# Altium PCB ArmBand-Sensor-Board_v2.0.PcbDoc
Units mil, origin at the board's own origin, x right, y up, seen from the top; angles counter-clockwise.
Board outline 1889.76 x 1023.87 mil, 2 copper layers (Top Layer, Bottom Layer), stack 34 mil thick; 46 components, 37 nets, 156 pads, 48 vias.
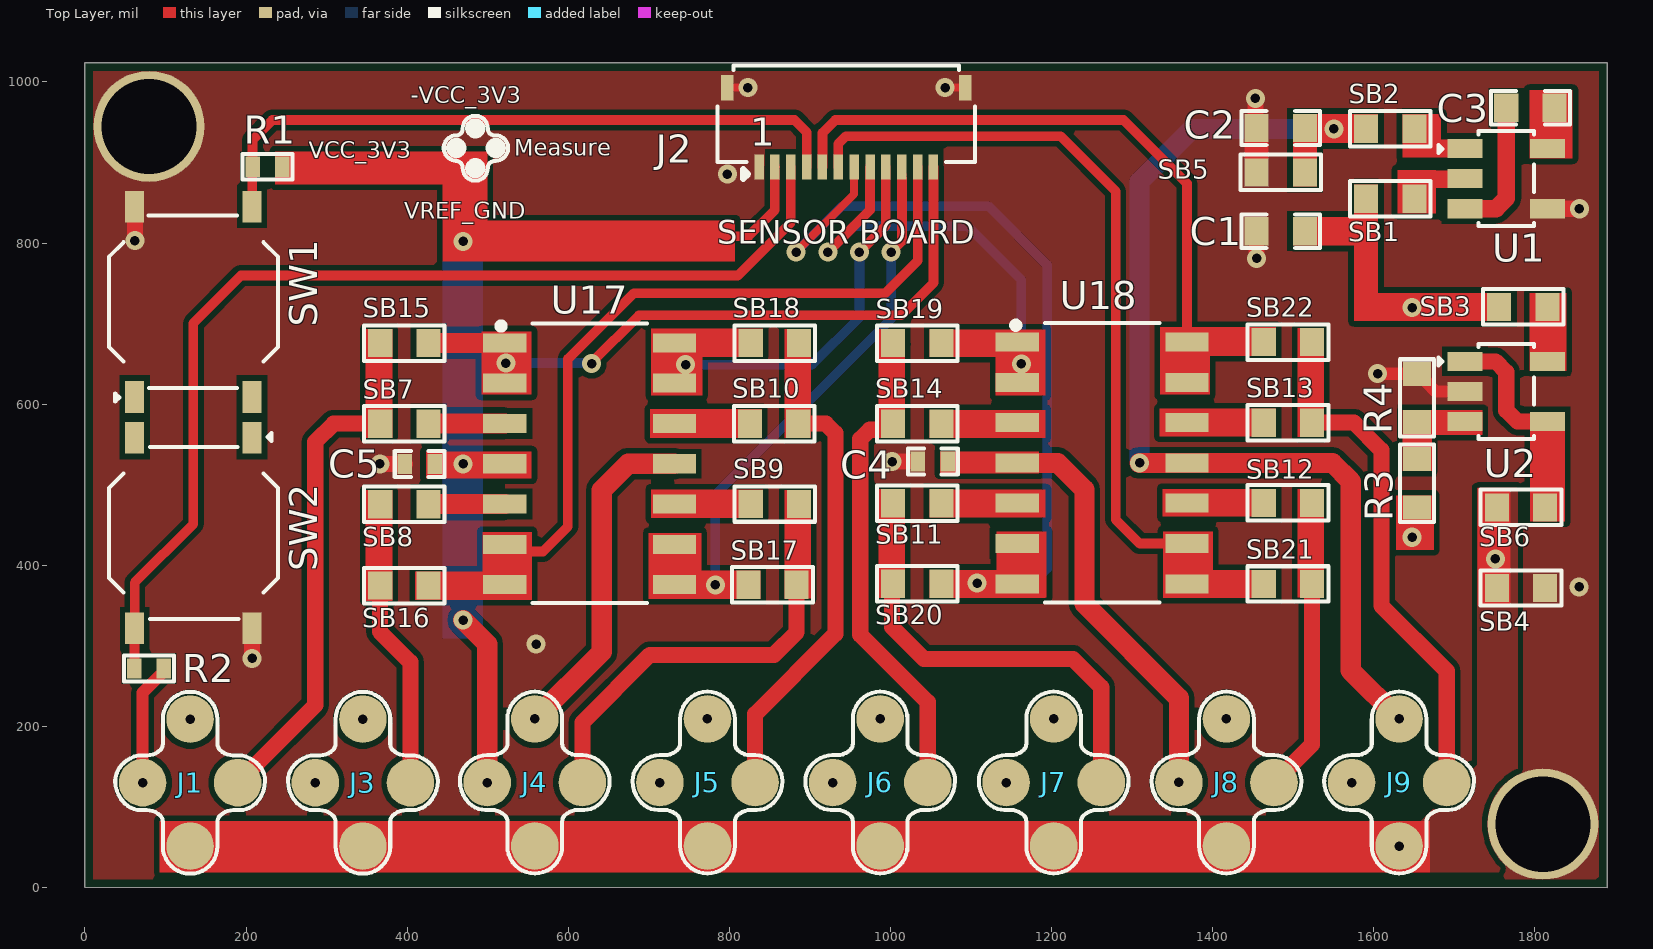
[diagram p0: Top Layer view]
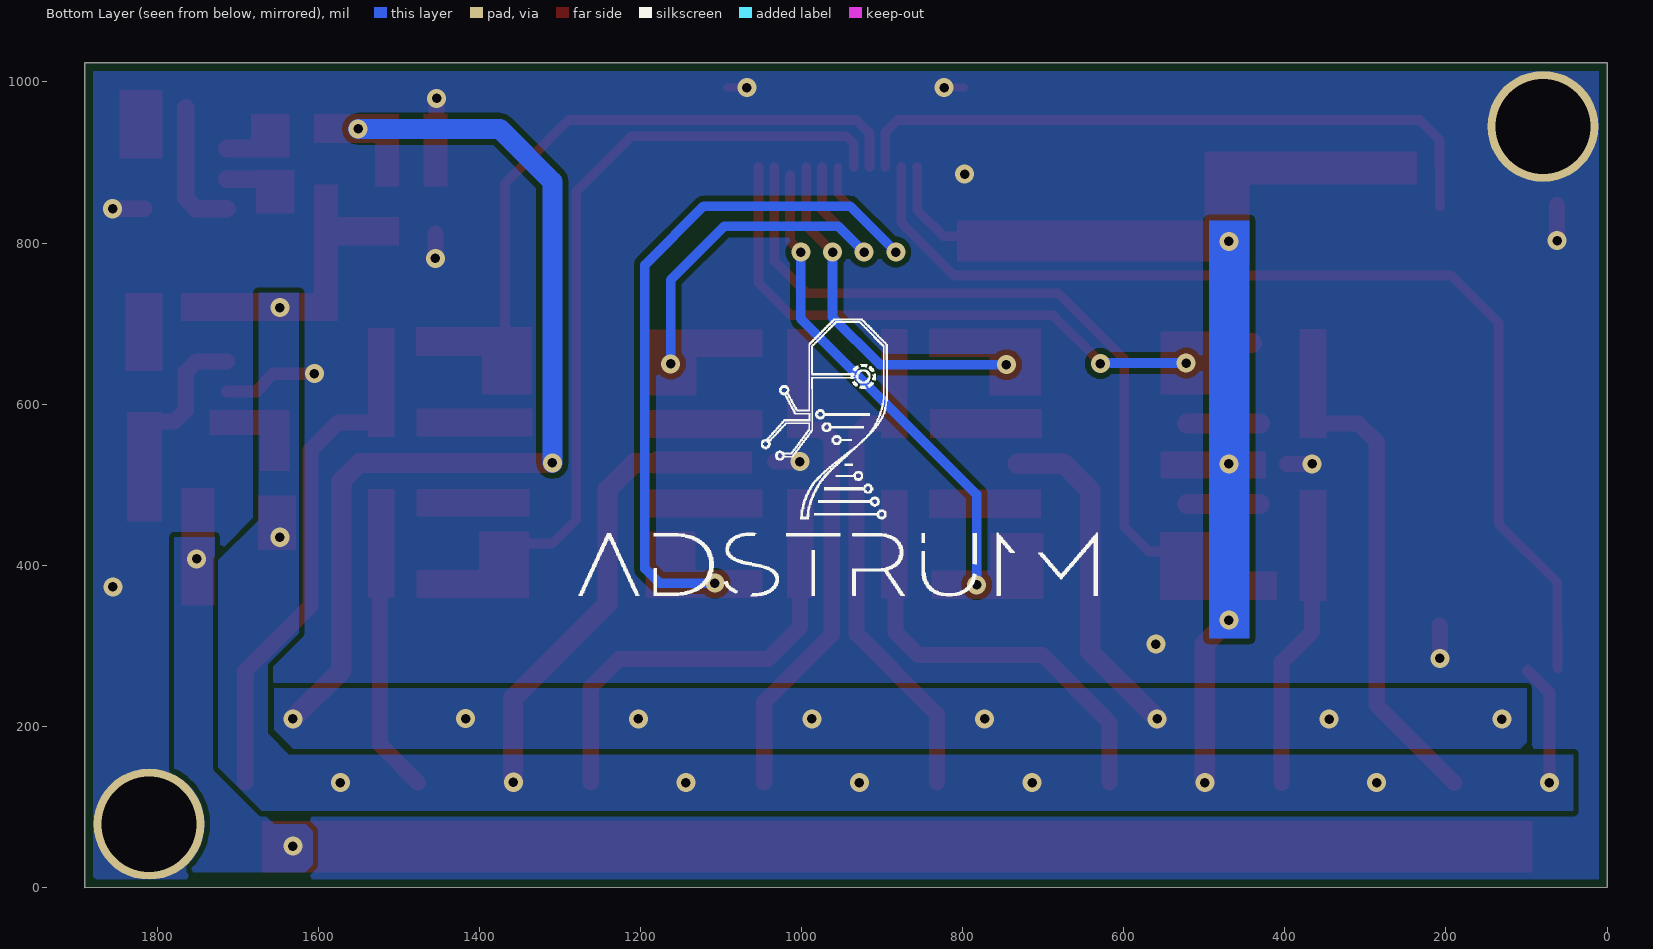
[diagram p1: Bottom Layer view, seen from below]

## Layer stack, top to bottom
Top Solder: solder mask 3, Solder Resist, Dk 3.5
Top Layer: signal copper 9
Dielectric 1: dielectric 16, FR-4, Dk 4.8
Bottom Layer: signal copper 9
Bottom Solder: solder mask 3, Solder Resist, Dk 3.5

## Board outline
0,0 0,1023.62 1889.76,1023.62 1889.76,-0.25

## Design rules (kind name [scope] priority, off if disabled: settings)
BoardOutlineClearance [All] p1: gap=0 ignorepadtopadclearanceinfootprint=FALSE except(10: Poly-OutlineEdge)
Clearance [All] p1: gap=7 ignorepadtopadclearanceinfootprint=FALSE except(0: Arc-Hole Track-Hole SMDPad-Hole THPad-Hole Via-Hole Fill-Hole Poly-Hole Region-Hole Text-Hole; 4: Arc-SMDPad Track-SMDPad SMDPad-SMDPad)
HoleSize [All] p1: absolutevalues=TRUE maxlimit=1000 minlimit=1 maxpercent=80.000 minpercent=20.000
HoleToHoleClearance [All] p1: gap=0 allowstackedmicrovias=TRUE
MinimumSolderMaskSliver [All] p1: minsoldermaskwidth=0
PolygonConnect [All] p1: connectstyle=Direct reliefconductorwidth=10 reliefentries=4 polygonreliefangle="90 Angle" airgapwidth=10
RoutingVias [All] p1: holewidth=11.81 width=23.62 viastyle="Through Hole" minholewidth=11.81 minwidth=23.62 maxholewidth=11.81 maxwidth=23.62
SilkToSilkClearance [All] p1: silktosilkclearance=0
SilkToSolderMaskClearance [IsPad] p1: minsilkscreentomaskgap=0 clearancetoexposedcopper=TRUE
SolderMaskExpansion [All] p1: expansion=4 istentingtop=FALSE
Width [All] p1: maxlimit=40 minlimit=10 preferedwidth=22
25 further rules are at their usual default settings.

## Classes and differential pairs
component class U_Opamp-Sheet2: C1 C2 C3 C4 C5 R3 R4 SB1 SB2 SB3 SB7 SB8 SB9 SB10 SB11 SB12 SB13 SB14 U1 U2 U17 U18
component class U_Connector-Sheet: J1 J2 J3 J4 J5 J6 J7 J8 J9 R1 R2 SB4 SB5 SB6 SB15 SB16 SB17 SB18 SB19 SB20 SB21 SB22 SW1 SW2

## Components (designator, comment, footprint, x,y, rotation, side; value= is the part's Value field where it differs from the comment)
C1 "10uF" Cap-0603 1484.63,814.75 r180 top
C2 "10uF" Cap-0603 1484.63,942.75 r180 top
C3 "10uF" Cap-0603 1794.63,968 r180 top locked
C4 "0.1uF" Cap-0402 1052.63,528.75 r180 top
C5 "0.1uF" Cap-0402 415.63,525.75 r180 top
J1 "2x2 Pad" "2x2 Pad" 130.63,130 r180 top locked
J2 "FH34SRJ-12S-0.5SH(50)" FH34SRJ-12S-0.5SH(50)_ 945.22,943.65 r180 top locked
J3 "2x2 Pad" "2x2 Pad" 345.06,130 r180 top locked
J4 "2x2 Pad" "2x2 Pad" 558.49,130.2 r180 top locked
J5 "2x2 Pad" "2x2 Pad" 772.92,130.2 r180 top locked
J6 "2x2 Pad" "2x2 Pad" 987.34,130.2 r180 top locked
J7 "2x2 Pad" "2x2 Pad" 1202.77,130.2 r180 top locked
J8 "2x2 Pad" "2x2 Pad" 1417.2,130.2 r180 top locked
J9 "2x2 Pad" "2x2 Pad" 1631.63,130.2 r180 top locked
R1 "10K" Res-0402 226.63,894.75 r0 top locked
R2 "10K" Res-0402 79.63,271.75 r0 top
R3 "64K" Res-0603 1653.63,501.75 r270 top locked
R4 "64K" Res-0603 1653.88,607.75 r90 top locked
SB1 "Solder Bridge" "Solder Bridge" 1620.63,855 r0 top locked
SB2 "Solder Bridge" "Solder Bridge" 1620.63,942 r180 top
SB3 "Solder Bridge" "Solder Bridge" 1785.63,720.75 r0 top
SB4 "Solder Bridge" "Solder Bridge" 1782.92,371.75 r0 top locked
SB5 "Solder Bridge" "Solder Bridge" 1484.63,887.75 r180 top
SB6 "Solder Bridge" "Solder Bridge" 1782.92,471.75 r180 top locked
SB7 "Solder Bridge 0603" "Solder Bridge" 396.63,575.75 r0 top locked
SB8 "Solder Bridge 0603" "Solder Bridge" 396.63,475.75 r0 top locked
SB9 "Solder Bridge 0603" "Solder Bridge" 856.63,476 r180 top locked
SB10 "Solder Bridge 0603" "Solder Bridge" 855.63,575.75 r180 top locked
SB11 "Solder Bridge 0603" "Solder Bridge" 1033.36,477 r0 top locked
SB12 "Solder Bridge 0603" "Solder Bridge" 1493.63,477.37 r180 top locked
SB13 "Solder Bridge 0603" "Solder Bridge" 1493.63,577 r180 top locked
SB14 "Solder Bridge 0603" "Solder Bridge" 1033.36,575.75 r0 top locked
SB15 "Solder Bridge 0603" "Solder Bridge" 396.63,675.75 r0 top locked
SB16 "Solder Bridge 0603" "Solder Bridge" 396.63,374.75 r0 top locked
SB17 "Solder Bridge 0603" "Solder Bridge" 853.63,375.75 r180 top locked
SB18 "Solder Bridge 0603" "Solder Bridge" 856.63,675.75 r180 top locked
SB19 "Solder Bridge 0603" "Solder Bridge" 1033.36,675.75 r0 top locked
SB20 "Solder Bridge 0603" "Solder Bridge" 1033.36,377 r0 top locked
SB21 "Solder Bridge 0603" "Solder Bridge" 1493.63,376.75 r180 top locked
SB22 "Solder Bridge 0603" "Solder Bridge" 1493.63,677 r180 top locked
SW1 "TC-0522C-1.7-260G" TC-0522C-1.7-260G_ 134.63,727 r90 top locked value=-
SW2 "TC-0522C-1.7-260G" TC-0522C-1.7-260G_ 134.63,440 r270 top locked value=-
U1 "SGM3207YN5G/TR" SOT-23-5 1764.63,880 r0 top locked
U2 "TPMCP6021T-E/OT" SOT-23-5 1764.63,615.75 r0 top locked
U17 "LM324DT" SO-14 626.63,526 r0 top locked
U18 "LM324DT" SO-14 1262.95,527 r0 top locked

## Footprints (in the part's own frame and the unit in brackets; to place one, negate y for a bottom-side part, rotate by r counter-clockwise, add the part's x,y. Pads: shape width x height; smd on the part's side, far side on the other; paste and mask are expansions set on the pad)
"2x2 Pad" [mm]
  round 1.5 smd paste+0 mask+0.055: 1(-1.5,0) 2(0,-2.007) 3(1.5,0) 4(0,2)
  silkscreen extent -2.36,-2.87 2.36,2.87
Cap-0402 [mil]
  rect 18x25 smd mask+2.36: 1(-18.5,0) 2(18.5,0)
  silkscreen extent -31,-16 31,16, body extent -20,-10 20,10, height 19
Cap-0603 [mil]
  rect 30x35 smd mask+2.36: 1(-30,0) 2(30,0)
  silkscreen extent -49,-21 49,21, body extent -32,-16 31,16, height 34
FH34SRJ-12S-0.5SH(50)_ [mm]
  rect 0.3x0.8 smd: 1(2.75,1.25) 2(2.25,1.25) 3(1.75,1.25) 4(1.25,1.25) 5(0.75,1.25) 6(0.25,1.25) 7(-0.25,1.25) 8(-0.75,1.25) 9(-1.25,1.25) 10(-1.75,1.25) 11(-2.25,1.25) 12(-2.75,1.25)
  rect 0.4x0.8 smd: MP1(-3.75,-1.25) MP2(3.75,-1.25)
  silkscreen extent -4.06,-1.96 4.06,1.63, body extent -4,-1.9 4,1.9, height 1
Res-0402 [mil]
  rect 18x25 smd mask+2.17: 1(-18.5,0) 2(18.5,0)
  silkscreen extent -32,-17 32,16, body extent -23,-11 23,11, height 16
Res-0603 [mil]
  rect 30x35 smd: 1(-30,0) 2(30,0)
  silkscreen extent -48,-21 48,21, body extent -31,-17 31,17, height 18
SO-14 [mm] "0.4 V/us 4 1.3MHz 3V ~ 32V, ±1.5V ~ 16V 1.5mA General Purpose SOIC-14_150mil Operational Amplifier ROHS"
  rect 1.37x0.6 smd: 1(-2.675,3.81) 2(-2.675,2.54) 3(-2.675,1.27) 4(-2.675,0) 5(-2.675,-1.27) 6(-2.675,-2.54) 7(-2.675,-3.81) 8(2.675,-3.81) 9(2.675,-2.54) 10(2.675,-1.27) 11(2.675,0) 12(2.675,1.27) 13(2.675,2.54) 14(2.675,3.81)
  silkscreen extent -2.87,-4.39 1.8,4.42, body extent -3.1,-4.37 3.1,4.37, height 1.76
"Solder Bridge" [mil] "Solder Bridge ON"
  rect 30x35 smd: 1(-30,0) 2(30,0)
  silkscreen extent -50,-22 50,22
SOT-23-5 [mm]
  rect 1.1x0.6 smd: 1(-1.3,0.95) 2(-1.3,0) 3(-1.3,-0.95) 4(1.3,-0.95) 5(1.3,0.95)
  silkscreen extent -2.13,-1.5 0.88,1.5, body extent -1.4,-1.45 1.4,1.45, height 1.45
TC-0522C-1.7-260G_ [mm]
  rect 1x0.6 smd: 1(-3,1.85) 2(3,1.85) 3(3,-1.85) 4(-3,-1.85)
  silkscreen extent -3.15,-2.67 2.72,2.67, body extent -3.2,-2.6 3.2,2.6, height 1.7

## Part data
C1 C2 C3: library part CL10A106MA8NRNC, "CAP CER 10UF 25V X5R 0603", Case Code (Imperial)=0603, Case Code (Metric)=1608, Dielectric=X5R, LCSC Part Number=C96446, Manufacturer=Samsung, Max Operating Temperature=85°C, Min Operating Temperature=-55°C, Package Quantity=1, Tolerance=20%, Voltage Rating=25V, Capacitance=10uF, Case/Package=0603, Category="Ceramic Capacitors", ComponentLink1Description=https://datasheet.ciiva.com/25766/cl10a106ma8nrnc-25766562.pdf?src-supplier=Digi-Key, ComponentLink1URL=https://datasheet.ciiva.com/25766/cl10a106ma8nrnc-25766562.pdf?src-supplier=Digi-Key, Construction=Flat, Contact Plating=Tin, Lead Free="Lead Free", Length=0.063inch, Manufacturer Part Number=CL10A106MA8NRNC, Mount="Surface Mount", Packaging="Tape and Reel", Pricing 1="4000=0.03753, 8000=0.03700, 16000=0.03595, 24000=0.03515, 32000=0.03383, 40000=0.03304, 400000=0.03225 (USD)", RoHS=Yes, RoHS Compliant=Yes, Series=CL, Supplier 1=Avnet, Supplier Part Number 1=CL10A106MA8NRNC, Termination=Wraparound, Thickness=0.035inch, Width=0.031inch
C4 C5: library part GRM155R71H104ME14D, "CAP CER 0.1UF 50V X7R 0402", Capacitance=100nF, Case/Package=0402, LCSC Part Number=C182412, Manufacturer=Murata, Max Operating Temperature=125°C, Min Operating Temperature=-55°C, Tolerance=20%, Voltage Rating=50V, Category="Ceramic Capacitors", ComponentLink1Description=http://www.mouser.com/ds/2/281/c02e-2905.pdf?src-supplier=Mouser, ComponentLink1URL=http://www.mouser.com/ds/2/281/c02e-2905.pdf?src-supplier=Mouser, ComponentLink2Description=http://search.murata.co.jp/Ceramy/image/img/A01X/G101/ENG/GRM155R71H104ME14-01.pdf?src-supplier=Digi-Key, ComponentLink2URL=http://search.murata.co.jp/Ceramy/image/img/A01X/G101/ENG/GRM155R71H104ME14-01.pdf?src-supplier=Digi-Key, ComponentLink3Description=http://psearch.en.murata.com/capacitor/product/GRM155R71H104ME14%23.pdf?src-supplier=Avnet, ComponentLink3URL=http://psearch.en.murata.com/capacitor/product/GRM155R71H104ME14%23.pdf?src-supplier=Avnet, Item Type=Capacitor, Length=0.039inch, Manufacturer Part Number=GRM155R71H104ME14D, Mount="Surface Mount", Packaging="Cut Tape", Pricing 1="10000=0.00444, 20000=0.00420, 40000=0.00396, 60000=0.00372, 80000=0.00348, 100000=0.00324, 1000000=0.00300 (USD)", RoHS=Yes, RoHS Compliant=Yes, Stock 1=100000, Supplier 1=Avnet, Supplier Part Number 1=GRM155R71H104ME14D, Thickness=0.022inch, Width=0.02inch
J1 J3 J4 J5 J6 J7 J8 J9: "Wire Connecting Pad"
J2: "CONN FPC/FFC 12POS .5MM", LCSC Part Number=C424659, Manufacturer=Hirose, Supplier Part Number 1=FH34SRJ-12S-0.5SH(50)-ND, Category="FFC / FPC", ComponentLink1Description=https://www.hirose.com/product/en/download_file/key_name/FH34SRJ/category/Catalog/doc_file_id/31646/?file_category_id=4&item_id=27&is_series=1&src-supplier=Digi-Key, ComponentLink1URL=https://www.hirose.com/product/en/download_file/key_name/FH34SRJ/category/Catalog/doc_file_id/31646/?file_category_id=4&item_id=27&is_series=1&src-supplier=Digi-Key, Item Type="FFC Connector", Manufacturer Part Number=FH34SRJ-12S-0.5SH(50), Pricing 1="5000=0.47775 (USD)", RoHS=Yes, Supplier 1=Digi-Key
R1 R2: library part RC0402FR-0710KL, "RES 10K OHM 1% 1/16W 0402", Case Code (Imperial)=0402, Case Code (Metric)=1005, LCSC Part Number=C60490, Manufacturer=Yageo, Max Operating Temperature=155°C, Max Power Dissipation=63mW, Min Operating Temperature=-55°C, Power Rating=62.5mW, Resistance=10kR, Resistance Tolerance=1%, Resistor Type="Thick Film", Supplier Part Number 1=603-RC0402FR-0710KL, Temperature Coefficient=100ppm/°C, Voltage Rating=50V, Case/Package=0402, Category="Chip SMD Resistors", ComponentLink1Description=https://datasheet.ciiva.com/7660/38568-7660787.pdf?src-supplier=Element14, ComponentLink1URL=https://datasheet.ciiva.com/7660/38568-7660787.pdf?src-supplier=Element14, ComponentLink2Description=https://datasheet.ciiva.com/7849/1686128-7849814.pdf?src-supplier=Element14, ComponentLink2URL=https://datasheet.ciiva.com/7849/1686128-7849814.pdf?src-supplier=Element14, ComponentLink3Description=https://datasheet.ciiva.com/7983/1018594-7983486.pdf?src-supplier=Element14, ComponentLink3URL=https://datasheet.ciiva.com/7983/1018594-7983486.pdf?src-supplier=Element14, ComponentLink4Description=https://datasheet.ciiva.com/22747/1018594-22747512.pdf?src-supplier=Element14, ComponentLink4URL=https://datasheet.ciiva.com/22747/1018594-22747512.pdf?src-supplier=Element14, ComponentLink5Description=https://datasheet.ciiva.com/12667/pyu-rc0402-51-rohs-l-6-r-12667067.pdf?src-supplier=Mouser, ComponentLink5URL=https://datasheet.ciiva.com/12667/pyu-rc0402-51-rohs-l-6-r-12667067.pdf?src-supplier=Mouser, ComponentLink6Description=https://datasheet.ciiva.com/7849/1784430-7849813.pdf?src-supplier=Element14, ComponentLink6URL=https://datasheet.ciiva.com/7849/1784430-7849813.pdf?src-supplier=Element14, ComponentLink7Description=https://datasheet.ciiva.com/7849/1784430-7849815.pdf?src-supplier=Element14, ComponentLink7URL=https://datasheet.ciiva.com/7849/1784430-7849815.pdf?src-supplier=Element14, Construction=Rectangular, Depth=0.5mm, Features="Moisture Resistant", Height=0.32mm, Lead Free="Lead Free", Lead Pitch=0.2mm, Length=1mm, Manufacturer Part Number=RC0402FR-0710KL, Military Standard=Not, Number of Pins=2, Number of Terminations=2, Packaging="Tape and Reel", Pricing 1="1=0.10000, 10=0.01400, 50=0.01400, 100=0.00500, 1000=0.00300, 10000=0.00200 (USD)", REACH SVHC="No SVHC", RoHS=Yes, RoHS Compliant=Yes, Series=RC, Stock 1=18648329, Supplier 1=Mouser, Termination=SMD/SMT, Tolerance=1%, Voltage Rating (DC)=50V, Width=0.5mm, Working Voltage=50V
R3 R4: library part ARG03DTC6402N, "1/10W Thin Film Resistor 75V ±0.5% ±25ppm/℃ -55℃~+155℃ 64kΩ 0603 Chip Resistor - Surface Mount ROHS", LCSC Part Number=C2902643, Manufacturer="iking Tech", ComponentLink1Description=LCSC, ComponentLink1URL=https://lcsc.com/product-detail/Chip-Resistor-Surface-Mount_Viking-Tech-ARG03DTC6402N_C2902643.html, Item Type=Resistor, Manufacturer Part Number=ARG03DTC6402N
SB1 SB2 SB3 SB4 SB5 SB6: "Solder Bridge ON"
SB7 SB8 SB9 SB10 SB11 SB12 SB13 SB14 SB15 SB16 SB17 SB18 SB19 SB20 SB21 SB22: "Solder Bridge ON", Manufacturer Part Number="Solder Bridge", Item Type="Solder Bridge"
SW1 SW2: "No Gull Wing 50mA 100MΩ 80000 260gf@±50gf 12V -25℃~+85℃ 1.7mm Golden Round Button Brick nogging SPST SMD Tactile Switches ROHS", LCSC Part Number=C2845290, Manufacturer=HCTL, ComponentLink1Description=LCSC, ComponentLink1URL=https://www.lcsc.com/product-detail/Tactile-Switches_HCTL-TC-0522C-1-7-260G_C2845290.html, Item Type=Switch, Manufacturer Part Number=TC-0522C-1.7-260G
U1: "NO Charge pump 1 -5.5V~-1.4V 1.4V~5.5V 60mA 19kHz SOT-23-5 DC-DC Converters ROHS", LCSC Part Number=C80403, Manufacturer="SG Micro", Category=Uncategorized, Item Type=IC, Manufacturer Part Number=SGM3207YN5G/TR, Pricing 1="3000=0.38750, 6000=0.36250, 12000=0.33750, 18000=0.32500, 24000=0.31250, 30000=0.31250, 300000=0.30500 (USD)", RoHS=No, Supplier 1=Avnet, Supplier Part Number 1=SGM3207YN5G/TR
U2: "SOT-23-5 Operational Amplifier ROHS", LCSC Part Number=C2923365, Manufacturer="TECH PUBLIC", ComponentLink1Description=LCSC, ComponentLink1URL=https://www.lcsc.com/product-detail/Operational-Amplifier_TECH-PUBLIC-TPMCP6021T-E-OT_C2923365.html, Item Type=IC, Manufacturer Part Number=TPMCP6021T-E/OT
U17 U18: "IC OPAMP GP 1.3MHZ 14SO", Case/Package=SO, Dual Supply Voltage=12V, Input Bias Current=150nA, Input Offset Voltage (Vos)=7mV, Input Voltage Noise Density="40nV/sqrt Hz", Manufacturer=STMicroelectronics, Max Dual Supply Voltage=15V, Max Operating Temperature=70°C, Max Power Dissipation=400mW, Max Supply Voltage=30V, Min Dual Supply Voltage=1.5V, Min Operating Temperature=0°C, Min Supply Voltage=3V, Nominal Supply Current=1.2mA, Output Current=40mA, Package Quantity=2500, Voltage Gain=100dB, Bandwidth=1.3MHz, Category="Amplifiers - Op Amps, Buffer, Instrumentation", Common Mode Rejection Ratio=70dB, ComponentLink1Description=https://datasheet.ciiva.com/4758/cd00000457-103203-4758032.pdf?src-supplier=Mouser, ComponentLink1URL=https://datasheet.ciiva.com/4758/cd00000457-103203-4758032.pdf?src-supplier=Mouser, ComponentLink2Description=https://datasheet.ciiva.com/8008/1834360-8008827.pdf?src-supplier=Element14, ComponentLink2URL=https://datasheet.ciiva.com/8008/1834360-8008827.pdf?src-supplier=Element14, ComponentLink3Description=https://datasheet.ciiva.com/8008/1834360-8008490.pdf?src-supplier=Element14, ComponentLink3URL=https://datasheet.ciiva.com/8008/1834360-8008490.pdf?src-supplier=Element14, ComponentLink4Description=https://datasheet.ciiva.com/28630/1834360-28630538.pdf?src-supplier=Element14, ComponentLink4URL=https://datasheet.ciiva.com/28630/1834360-28630538.pdf?src-supplier=Element14, ComponentLink5Description=https://datasheet.ciiva.com/1795/cd00000457-1795560.pdf?src-supplier=Digi-Key, ComponentLink5URL=https://datasheet.ciiva.com/1795/cd00000457-1795560.pdf?src-supplier=Digi-Key, ComponentLink6Description=https://datasheet.ciiva.com/1795/cd00000457-1795559.pdf?src-supplier=Digi-Key, ComponentLink6URL=https://datasheet.ciiva.com/1795/cd00000457-1795559.pdf?src-supplier=Digi-Key, ComponentLink7Description=https://datasheet.ciiva.com/1795/cd00000457-1795561.pdf?src-supplier=Digi-Key, ComponentLink7URL=https://datasheet.ciiva.com/1795/cd00000457-1795561.pdf?src-supplier=Digi-Key, ComponentLink8Description=https://datasheet.ciiva.com/16375/cd00000457-16375528.pdf?src-supplier=Future+Electronics, ComponentLink8URL=https://datasheet.ciiva.com/16375/cd00000457-16375528.pdf?src-supplier=Future+Electronics, Contact Plating=Tin,Matte, Gain Bandwidth Product=1.3MHz, Height=1.65mm, Lead Free="Lead Free", Length=8.75mm, Manufacturer Part Number=LM324DT, Mount="Surface Mount", Number of Amplifiers=4, Number of Channels=4, Number of Circuits=4, Number of Elements=4, Number of Pins=14, Operating Supply Current=1.2mA, Operating Supply Voltage=15V, Output Current per Channel=40mA, Packaging="Cut Tape", Pricing 1="2500=0.18900 (USD)", Radiation Hardening=No, REACH SVHC="No SVHC", RoHS=Yes, RoHS Compliant=Yes, Series=LM324, Slew Rate=0.4V/µs, Stock 1=287500, Supplier 1="Arrow Electronics", Supplier Part Number 1=LM324DT, Supply Type=Single,Dual, Technology=BIPOLAR, Unity Gain Bandwidth Product=1.3MHz, Weight=0.009143oz, Width=4mm

## Free pads (board coordinates)
  round 137.8 hole 118.11: MH2(79.63,944.87) MH2(1810.13,78.5)

## Via types
v1: diameter 23.62, hole 11.81, Top Layer to Bottom Layer, tented both sides, 48 vias

## Nets (pads, with @x,y where several pads share a name; then routed paths per layer and width w, separated by ;. In a path a pad name is that pad's centre, name@x,y a point inside that pad or via, vN(x,y) a via of type N, cw(c..) or ccw(c..) an arc to the next point about the centre after c; other vN are vias at no path point)
-VCC_3V3: C2.1 J1.2 J3.2 J4.2 J5.2 J6.2 J7.2 J8.2 J9.2 SB2.2 SB5.1 U17.11 U18.11 | length 1631.6
  Top Layer w25: v1(558.49,209.2) 641.63,292.34 641.63,493.19 674.44,526 U17.11 ; v1(1309.38,527) U18.11 1548.82,527 1571.63,504.19 1571.63,269.2 v1(1631.63,209.2)
  Bottom Layer w25: v1(1309.38,527) 1309.38,876.38 1374.75,941.75 v1(1550.63,941.75)
  other v1: 130.63,209 345.06,209 772.92,209.2 987.34,209.2 1202.77,209.2 1417.02,209.58
CAP+: C3.1 U1.5
CAP-: C3.2 U1.3 | length 169
  Top Layer w22: U1.3 1751.74,842.6 1764.63,855.49 C3.2
GND: C1.2 C2.2 C4.2 C5.2 J2.1 J2.MP1 J2.MP2 pad.MH2 R4.2 SB4.2 SB5.2 SW1.2 SW2.2 U1.4 U2.2 | length 423.7
  Top Layer w10: J2.MP2 822.86,992.86 v1(823,993) ; C4.2@1032.74,527.36 C4.2 ; v1(1068,993) 1068.14,992.86 J2.MP1
  Top Layer w15: v1@1601,638 1601.25,637.75 R4.2 1656.38,637.75 1666.38,627.75 1666.38,626.16 1676.8,615.75 U2.2
  Top Layer w20: v1(62,803) SW1.2@62,847 ; v1(207.47,284.25) SW2.2 207.47,324.47 SW2.2@208,325 ; v1(366.3,525.75) C5.2@397.33,525.75 ; v1(1002.1,528.75) C4.2@1033.13,528.75 ; C2.2@1453.15,948.56 v1(1453.15,979.59) ; v1(1454.62,780.92) C1.2@1454.62,811.94 ; U1.4 v1(1855.46,842.59)
  other v1: 560.05,302.2 1855,373 1605,638 797.57,885.65
Measure1: J1.1 SB7.1 SB15.1 | length 557
  Top Layer w20: J1.1 286,226.32 286,553.12 308.63,575.75 SB7.1@370.63,575.75
Measure2: J3.1 SB8.1 SB16.1 | length 310.6
  Top Layer w20: 365.13,424.5 365.13,374.75 366.15,373.73 366.15,317.69 404.11,279.72 J3.1
Measure3: J4.1 SB9.1 SB17.1 | length 446
  Top Layer w20: J4.1 617.54,204.66 701.48,288.59 855.48,288.59 883.63,316.75 SB17.1
Measure4: J5.1 SB10.1 SB18.1 | length 526
  Top Layer w20: J5.1 831.97,215.09 931.63,314.75 931.63,564.03 919.91,575.75 SB10.1
Measure5: J6.1 SB14.1 SB19.1 | length 520.5
  Top Layer w10: SB19.1@1013.36,673.25 SB19.1@1013.36,675.75
  Top Layer w20: SB14.1@1000.86,570.75 1000.86,573.25 SB14.1 1002.1,577 1002.1,575 995.36,568.25 974.35,568.25 962.63,556.53 962.63,313.75 1046.4,229.98 J6.1
Measure6: J7.1 SB11.1 SB20.1 | length 515.4
  Top Layer w20: 1001.86,427 1001.86,374.5 1001.86,323.52 1041.63,283.75 1226.63,283.75 1261.83,248.55 J7.1 ; SB20.1@1003.36,374.5 SB20.1
Measure7: J8.1 SB12.1 SB21.1 | length 266.2
  Top Layer w20: J8.1 1523.63,177.57 SB21.1
Measure8: J9.1 SB13.1 SB22.1 | length 546.5
  Top Layer w20: SB13.1 1575.63,577 1609.63,543 1609.63,349.75 1690.69,268.69 J9.1
NetSB1_2: SB1.2 U1.2 | length 74.6
  Top Layer w22: SB1.2 1650.63,857.5 1672.32,879.19 1712.64,879.19 U1.2
NetSB2_1: SB2.1 U1.1 | length 77
  Top Layer w22: SB2.1 1650.63,939.5 SB2.1@1654.63,935.5 ; U1.1 1675.23,917.4 SB2.1@1657.13,935.5 ; SB2.1@1654.63,935.5 SB2.1@1657.13,935.5 ; SB2.1@1654.63,935.5 SB2.1@1657.13,935.5
NetSB3_2: SB3.2 U2.5
NetSB7_2: SB7.2 U17.3 | length 90.8
  Top Layer w10: SB7.2@430.63,575.75 SB7.2@430.88,576
  Top Layer w25: SB7.2@430.88,576 U17.3
NetSB8_2: SB8.2 U17.5 | length 91.1
  Top Layer w10: SB8.2@430.63,475.75 SB8.2@430.88,476 ; U17.5 U17.5@521.63,476
  Top Layer w25: SB8.2@430.88,476 U17.5
NetSB9_2: SB9.2 U17.10
NetSB10_2: SB10.2 U17.12
NetSB11_2: SB11.2 U18.5
NetSB12_2: SB12.2 U18.10 | length 0.5
  Top Layer w10: SB12.2@1466.26,477 SB12.2@1466.63,477.37
NetSB13_2: SB13.2 U18.12
NetSB14_2: SB14.2 U18.3
SENSOR1: J2.12 SB15.2 U17.1 U17.2 | length 807.8
  Top Layer w10: SB15.2@440.63,675.75 SB15.2@440.88,676
  Top Layer w12: v1(629.17,650.46) 629.17,651.54 687.86,710.23 1013.12,710.23 1053.48,750.6 J2.12
  Top Layer w25: SB15.2@440.88,676 U17.1 U17.1@531.32,676
  Bottom Layer w10: v1@628.63,651 v1(629.17,650.46)
  Bottom Layer w12: v1(522.63,651) v1@628.63,651
SENSOR2: J2.11 SB16.2 U17.6 U17.7 | length 925.3
  Top Layer w12: U17.6 530.32,417 U17.6@539.47,417 ; 524.47,402 U17.6@539.47,417 ; J2.11 1033.8,777.92 993.64,737.76 681.39,737.76 599.63,656 599.63,448 568.63,417 U17.6@539.47,417
SENSOR3: J2.10 SB17.2 U17.8 U17.9 | length 674.8
  Top Layer w12: v1(1000.89,788.75) 1014.44,802.3 1014.44,880.81 1014.21,881.04 J2.10@1014.21,884.69
  Top Layer w22: U17.9 U17.9@750.93,426
  Top Layer w25: U17.8 782.38,376 v1(782.63,375.75)
  Bottom Layer w12: v1(782.63,375.75) 782.63,487.75 1000.89,706.01 v1(1000.89,788.75)
SENSOR4: J2.9 SB18.2 U17.13 U17.14 | length 440.6
  Top Layer w12: v1(961.63,788.75) 994.43,821.55 J2.9
  Bottom Layer w12: v1(745.63,649) 902.88,649 961.63,707.75 v1(961.63,788.75)
SENSOR5: J2.8 SB19.2 U18.1 U18.2 | length 514.5
  Top Layer w10: SB19.2@1073.36,675.75 SB19.2@1074.61,677
  Top Layer w12: v1(922.37,788.75) 974.74,841.12 J2.8
  Bottom Layer w12: v1(922.37,788.75) 954.37,820.75 1096.22,820.75 1162.63,754.34 v1(1162.63,650)
SENSOR6: J2.7 SB20.2 U18.6 U18.7 | length 972.5
  Top Layer w10: v1(883,788.75) 955.06,860.8 J2.7
  Bottom Layer w12: v1(883,788.75) 940,845.75 1121.63,845.75 1194.63,772.75 1194.63,395.75 1176.63,377.75 v1(1107.63,377.75)
SENSOR7: J2.6 SB21.2 U18.8 U18.9 | length 985.2
  Top Layer w10: SB21.2@1466.38,377 SB21.2@1466.63,376.75
  Top Layer w12: J2.6 935.37,923.49 944.63,932.75 1211.25,932.75 1279.63,864.37 1279.63,456.75 1309.38,427 U18.9@1353.32,427 ; U18.8@1353.63,377 U18.8 1368.26,412.06 U18.9@1353.32,427 ; U18.9 U18.9@1353.32,427
SENSOR8: J2.5 SB22.2 U18.13 U18.14 | length 731.1
  Top Layer w12: J2.5 915.69,936.77 931.67,952.75 1289.42,952.75 1368.26,873.91 U18.14
SW1: J2.4 R1.1 SW1.3 | length 831
  Top Layer w12: SW1.3 207.8,845.44 207.8,894.42 R1.1 208.13,928.25 232.63,952.75 881.02,952.75 896,937.77 J2.4
SW2: J2.3 R2.1 SW2.3 | length 1321.7
  Top Layer w12: R2.1 61.46,272.08 61.46,321.56 SW2.3 61.8,378.41 134.63,451.25 134.63,700.63 193.75,759.75 810.54,759.75 876.32,825.53 J2.3
VCC_3V3: C1.1 C4.1 C5.1 J1.3 J2.2 J3.3 J4.3 J5.3 J6.3 J7.3 J8.3 J9.3 R1.2 R2.2 R3.2 SB1.1 SB3.1 U17.4 U18.4 | length 1337.2
  Top Layer w10: R2.2@98.13,268.25 R2.2 ; SB1.1@1590.63,852.5 SB1.1
  Top Layer w12: v1@469,802 625.5,802 ; 626,802.5 631.97,808.47 823.88,808.47 856.54,841.14 856.54,894.34 J2.2
  Top Layer w15: v1(71.58,130) 71.58,241.69 R2.2@98.13,268.25
  Top Layer w22: SB3.1@1755.63,718.25 SB3.1
  Top Layer w25: v1(469.63,332) 499.43,302.2 v1(499.43,130.2) ; U18.4 1207.82,527 1240.95,493.87 1240.95,352.18 1358.15,234.98 1358.15,130.77 v1(1357.96,130.58)
  other v1: 286,130 713.86,130.2 928.29,130.2 1143.72,130.2 1572.57,130.2 1647.63,434.75 469.63,525.75 1647.63,719.75 469.63,802
VREF: SB6.1 U2.1 U2.4 | length 165.3
  Top Layer w10: U2.4@1812.92,575.45 U2.4
  Top Layer w20: U2.1 1751.34,653.15 1764.63,639.86 1764.63,592.35 1778.63,578.35 U2.4
VREF_GND: J1.4 J3.4 J4.4 J5.4 J6.4 J7.4 J8.4 J9.4 SB4.1 SB6.2 | length 429
  Top Layer w10: J1.4 J1.4@130.73,51.36 ; J7.4@1202.77,51.36 v1(1631.53,51.36) J9.4
  other v1: 1751,408
VS+1: R3.1 R4.1 U2.3
pads on no net: SW1.1 SW1.4 SW2.1 SW2.4

## Polygon pours and split planes (outlines as drawn)
VREF_GND on Top Layer "NONET_L-01_P-001" (solid, remove dead copper, pour order 5): 1655,78.5 1615.5,78.5 1607,70 1607,28 1616.25,18.75 1621.75,18.75 1778.63,18.75 1778.63,348.91 1778.63,496 1728.63,496 1728.63,152.13
GND on Top Layer "GND_L01_P003" (solid, remove dead copper, pour order 3): 0,-0.25 1889.76,-0.25 1889.76,1023.62 0,1023.62
VREF_GND on Bottom Layer "NONET_L-01_P-001" (solid, remove dead copper, pour order 4): 1655,78.5 1615.5,78.5 1607,70 1607,28 1616.25,18.75 1621.75,18.75 1778.63,18.75 1778.63,348.91 1778.63,434.75 1728.63,434.75 1728.63,152.13
VCC_3V3 on Bottom Layer "VCC_3V3_L02_P001" (solid, remove dead copper, pour order 1): 1624.26,738 1624.26,315.74 1642.31,297.69 1663,277 1663,191.45 1636.55,165 42.05,165 42.05,95 1670,95 1724,149 1724,406 1674,456 1674,738
GND on Bottom Layer "GND_L02_P000" (solid, remove dead copper, pour order 0): 0,-0.25 1889.76,-0.25 1889.76,1023.62 0,1023.62
-VCC_3V3 on Bottom Layer "-VCC_3V3_L02_P002" (solid, remove dead copper, pour order 2): 100,247 1655,247 1655,195.91 1630.09,171 109,171 100,180

## Other copper
Top Layer:
  region net VCC_3V3: 500,777 500,900.87 444.18,900.87 444.18,777
  rectangle net VCC_3V3: 236.13,873 500,913.97
  rectangle net VCC_3V3: 445,777 807,828
  rectangle net SENSOR2: 410,357 555,392.5
  rectangle net VCC_3V3: 1628,418.75 1674.63,486.75
  rectangle net VREF_GND: 1728.63,349.75 1769.63,495.75
  rectangle net SENSOR3: 699.63,358.25 838.63,393.75
  rectangle net NetSB9_2: 702.63,458.5 841.63,494
  rectangle net NetSB10_2: 701.63,558.25 840.63,593.75
  rectangle net SENSOR4: 702.63,658.25 841.63,693.75
  rectangle net VS+1: 1635.63,516.75 1672.63,592.75
  rectangle net VS+1: 1636.38,561.75 1735.1,592.75
  rectangle net VREF: 1794.16,454.25 1837.47,590.16
  rectangle net NetSB3_2: 1793.63,641.34 1839.63,738.25
  rectangle net VCC_3V3: 1575.63,703.25 1770.63,738.25
  rectangle net VCC_3V3: 1499.63,797.25 1605.63,832.25
  rectangle net VCC_3V3: 1575.63,703.25 1605.63,872.5
  rectangle net SENSOR8: 1334.45,659.5 1478.63,695.75
  rectangle net GND: 1439.63,870.25 1469.63,960.25
  rectangle net -VCC_3V3: 1499.63,924.5 1605.63,960.25
  rectangle net -VCC_3V3: 1499.63,870.25 1529.63,960.25
  rectangle net NetSB2_1: 1635.63,906 1683.63,960
  region net NetSB13_2: 1478.23,594.5 1334.35,594.5 1334.35,559.84 1478.23,559.84
  region net NetSB12_2: 1478.23,494.87 1337.63,494.87 1337.63,460.21 1478.23,460.21
  region net SENSOR7: 1478.23,394.25 1338.63,394.25 1338.63,359.59 1478.23,359.59
  rectangle net SENSOR6: 1048.76,359.5 1192.63,394.16
  rectangle net NetSB11_2: 1048.76,459.5 1192.63,494.16
  rectangle net NetSB14_2: 1048.76,558.25 1192.63,592.91
  rectangle net SENSOR5: 1048.76,658.25 1192.63,692.91
  rectangle net VCC_3V3: 1061.63,513.75 1184.6,541.25
  rectangle net VREF_GND: 92.45,18.75 1669.63,82.75
  rectangle net Measure3: 868.63,358.5 901.63,493.5
  rectangle net Measure8: 1505.63,559.5 1538.63,694.5
  rectangle net Measure7: 1505.63,359.87 1538.63,494.87
  rectangle net Measure6: 985.36,359.5 1018.36,494.5
  rectangle net Measure5: 985.36,558.25 1018.36,693.25
  rectangle net Measure4: 868.63,558.25 901.63,693.25
  rectangle net Measure2: 348.63,355.75 381.63,493.25
  rectangle net Measure1: 348.63,558.25 381.63,693.25
  rectangle net SENSOR8: 1334.45,612 1396.76,690
  region net SENSOR1: 554.63,690 492.32,690 492.32,612 554.63,612
  region net SENSOR2: 555,441 493.32,441 493.32,363 555,363
  rectangle net VCC_3V3: 423.63,508 554.63,541
  rectangle net NetSB1_2: 1629.38,836.5 1677.38,890.5
  rectangle net CAP+: 1793.63,905 1846.63,990
  region net SENSOR7: 1400.63,442 1338.32,442 1338.32,364 1400.63,364
  region net SENSOR4: 766.63,691 702.63,691 702.63,610.75 766.63,610.75
  region net SENSOR6: 1193.63,442 1131.63,442 1131.63,359.75 1193.63,359.75
  region net SENSOR3: 765.63,440 699.63,440 699.63,362 765.63,362
  region net SENSOR5: 1192.63,689 1130.32,689 1130.32,611 1192.63,611
Bottom Layer:
  rectangle net VCC_3V3: 444,309 494,828

## Silkscreen, mask and mechanical layers (free items; w line width, h text height)
Top Overlay:
  circle w15: c484.61,893 r5
  circle w15: c484.61,942.44 r5
  circle w15: c461,918 r5
  circle w15: c510,918 r5
  lines w5: 460.97,901.87 cw(c460.58,893.42) 469.03,893 ccw(c484.61,893) 500.19,893 cw(c508.64,893.42) 509.98,901.77 ; 461,902.42 cw(c461,918) 461,933.58 ccw(c460.58,942.03) 469.03,942.44 cw(c484.61,942.44) 500.19,942.44 ccw(c508.64,942.03) 509.98,933.68 ; 510,902.42 ccw(c510,918) 510,933.58
  text "-VCC_3V3" at 404.68,967 h35
  text "Measure" at 533.16,901.87 h35
  text "VCC_3V3" at 278.17,898.32 h35
  text "VREF_GND" at 396.21,823.49 h35
  text "SENSOR BOARD" at 785,789 h50
Bottom Overlay:
  drawing of 2568 lines, arcs and shapes, not listed
Board Outline:
  the board outline again, w10
Fabrication:
  drawing of 191 lines, arcs and shapes, not listed
  text "Layer" at 2051.34,669 h60
  text "Name" at 2461.26,669 h60
  text "Material" at 3391,669 h60
  text "Thickness" at 4250.77,669 h60
  text "Constant" at 4900.6,669 h60
  text "Board Layer Stack" at 5470.46,669 h60
  text "Top Overlay" at 2461.26,549 h60
  text "Top Solder" at 2461.26,429 h60
  text "Solder Resist" at 3391,429 h60
  text "3.00mil" at 4250.77,429 h60
  text "3.5" at 4900.6,429 h60
  text "1" at 2051.34,309 h60
  text "Top Layer" at 2461.26,309 h60
  text "9.00mil" at 4250.77,309 h60
  text "Dielectric 1" at 2461.26,189 h60
  text "FR-4" at 3391,189 h60
  text "16.00mil" at 4250.77,189 h60
  text "4.8" at 4900.6,189 h60
  text "2" at 2051.34,69 h60
  text "Bottom Layer" at 2461.26,69 h60
  text "9.00mil" at 4250.77,69 h60
  text "Bottom Solder" at 2461.26,-51 h60
  text "Solder Resist" at 3391,-51 h60
  text "3.00mil" at 4250.77,-51 h60
  text "3.5" at 4900.6,-51 h60
  text "Bottom Overlay" at 2461.26,-171 h60
  text "Total board thickness:" at 2051.34,-291 h60
  text "40.00mil" at 4250.77,-291 h60
Drill Drawing:
  circle w10: c2072.62,1119.83 r33.33
  lines w10: 2039.29,1236.5 2105.96,1236.5 2105.96,1303.17 2039.29,1303.17 2039.29,1236.5
  lines w15: 1979.5,1041.5 11422.89,1041.5 ; 1979.5,1341.5 11422.89,1341.5 ; 2530.38,891.5 2530.38,1491.5 ; 3070.24,891.5 3070.24,1491.5 ; 4189.91,891.5 4189.91,1491.5 ; 4695.79,891.5 4695.79,1491.5 ; 5429.59,891.5 5429.59,1491.5 ; 6929.14,891.5 6929.14,1491.5 ; 7518.99,891.5 7518.99,1491.5 ; 8264.78,891.5 8264.78,1491.5 ; 9154.53,891.5 9154.53,1491.5 ; 10020.29,891.5 10020.29,1491.5 ; 1979.5,891.5 11422.89,891.5 11422.89,1491.5 1979.5,1491.5 1979.5,891.5
  text "Symbol" at 2069.5,1386.5 h72
  text "Count" at 2575.38,1386.5 h72
  text "Hole Size" at 3115.24,1386.5 h72
  text "Plated" at 4234.91,1386.5 h72
  text "Hole Type" at 4740.79,1386.5 h72
  text "Drill Layer Pair" at 5474.59,1386.5 h72
  text "Via/Pad" at 6974.14,1386.5 h72
  text "Pad Shape" at 7563.99,1386.5 h72
  text "Template" at 8309.78,1386.5 h72
  text "Hole Length" at 9199.53,1386.5 h72
  text "Routed Path Length" at 10065.29,1386.5 h72
  text "48" at 2575.38,1236.5 h60
  text "11.81mil (0.300mm)" at 3115.24,1236.5 h60
  text "PTH" at 4234.91,1236.5 h60
  text "Round" at 4740.79,1236.5 h60
  text "Top Layer - Bottom Layer" at 5474.59,1236.5 h60
  text "Via" at 6974.14,1236.5 h60
  text "Rounded" at 7563.99,1236.5 h60
  text "v60h30m0mx0(1)" at 8309.78,1236.5 h60
  text "-" at 9199.53,1236.5 h60
  text "-" at 10065.29,1236.5 h60
  text "2" at 2575.38,1086.5 h60
  text "118.11mil (3.000mm)" at 3115.24,1086.5 h60
  text "PTH" at 4234.91,1086.5 h60
  text "Round" at 4740.79,1086.5 h60
  text "Top Layer - Bottom Layer" at 5474.59,1086.5 h60
  text "Pad" at 6974.14,1086.5 h60
  text "Rounded" at 7563.99,1086.5 h60
  text "c350h300" at 8309.78,1086.5 h60
  text "-" at 9199.53,1086.5 h60
  text "-" at 10065.29,1086.5 h60
  text "50 Total" at 2575.38,936.5 h60

## Dimensions
0,1023.62 to 0,-0.25 on Dimension
0,1023.62 to 1889.76,1023.62 on Dimension

## Text inside footprints (layer, text, board x,y; h text height)
J2: Top Overlay "1" at 826.23,920.57 h35